# Altium PCB IOT_Speaker.PcbDoc (part 1 of 4)
Units mm, origin at the board's own origin, x right, y up, seen from the top; angles counter-clockwise.
Board outline 89.7 x 68.14 mm, 2 copper layers (Top Layer, Bottom Layer), stack 1.448 mm thick; 210 components, 131 nets, 623 pads, 336 vias.
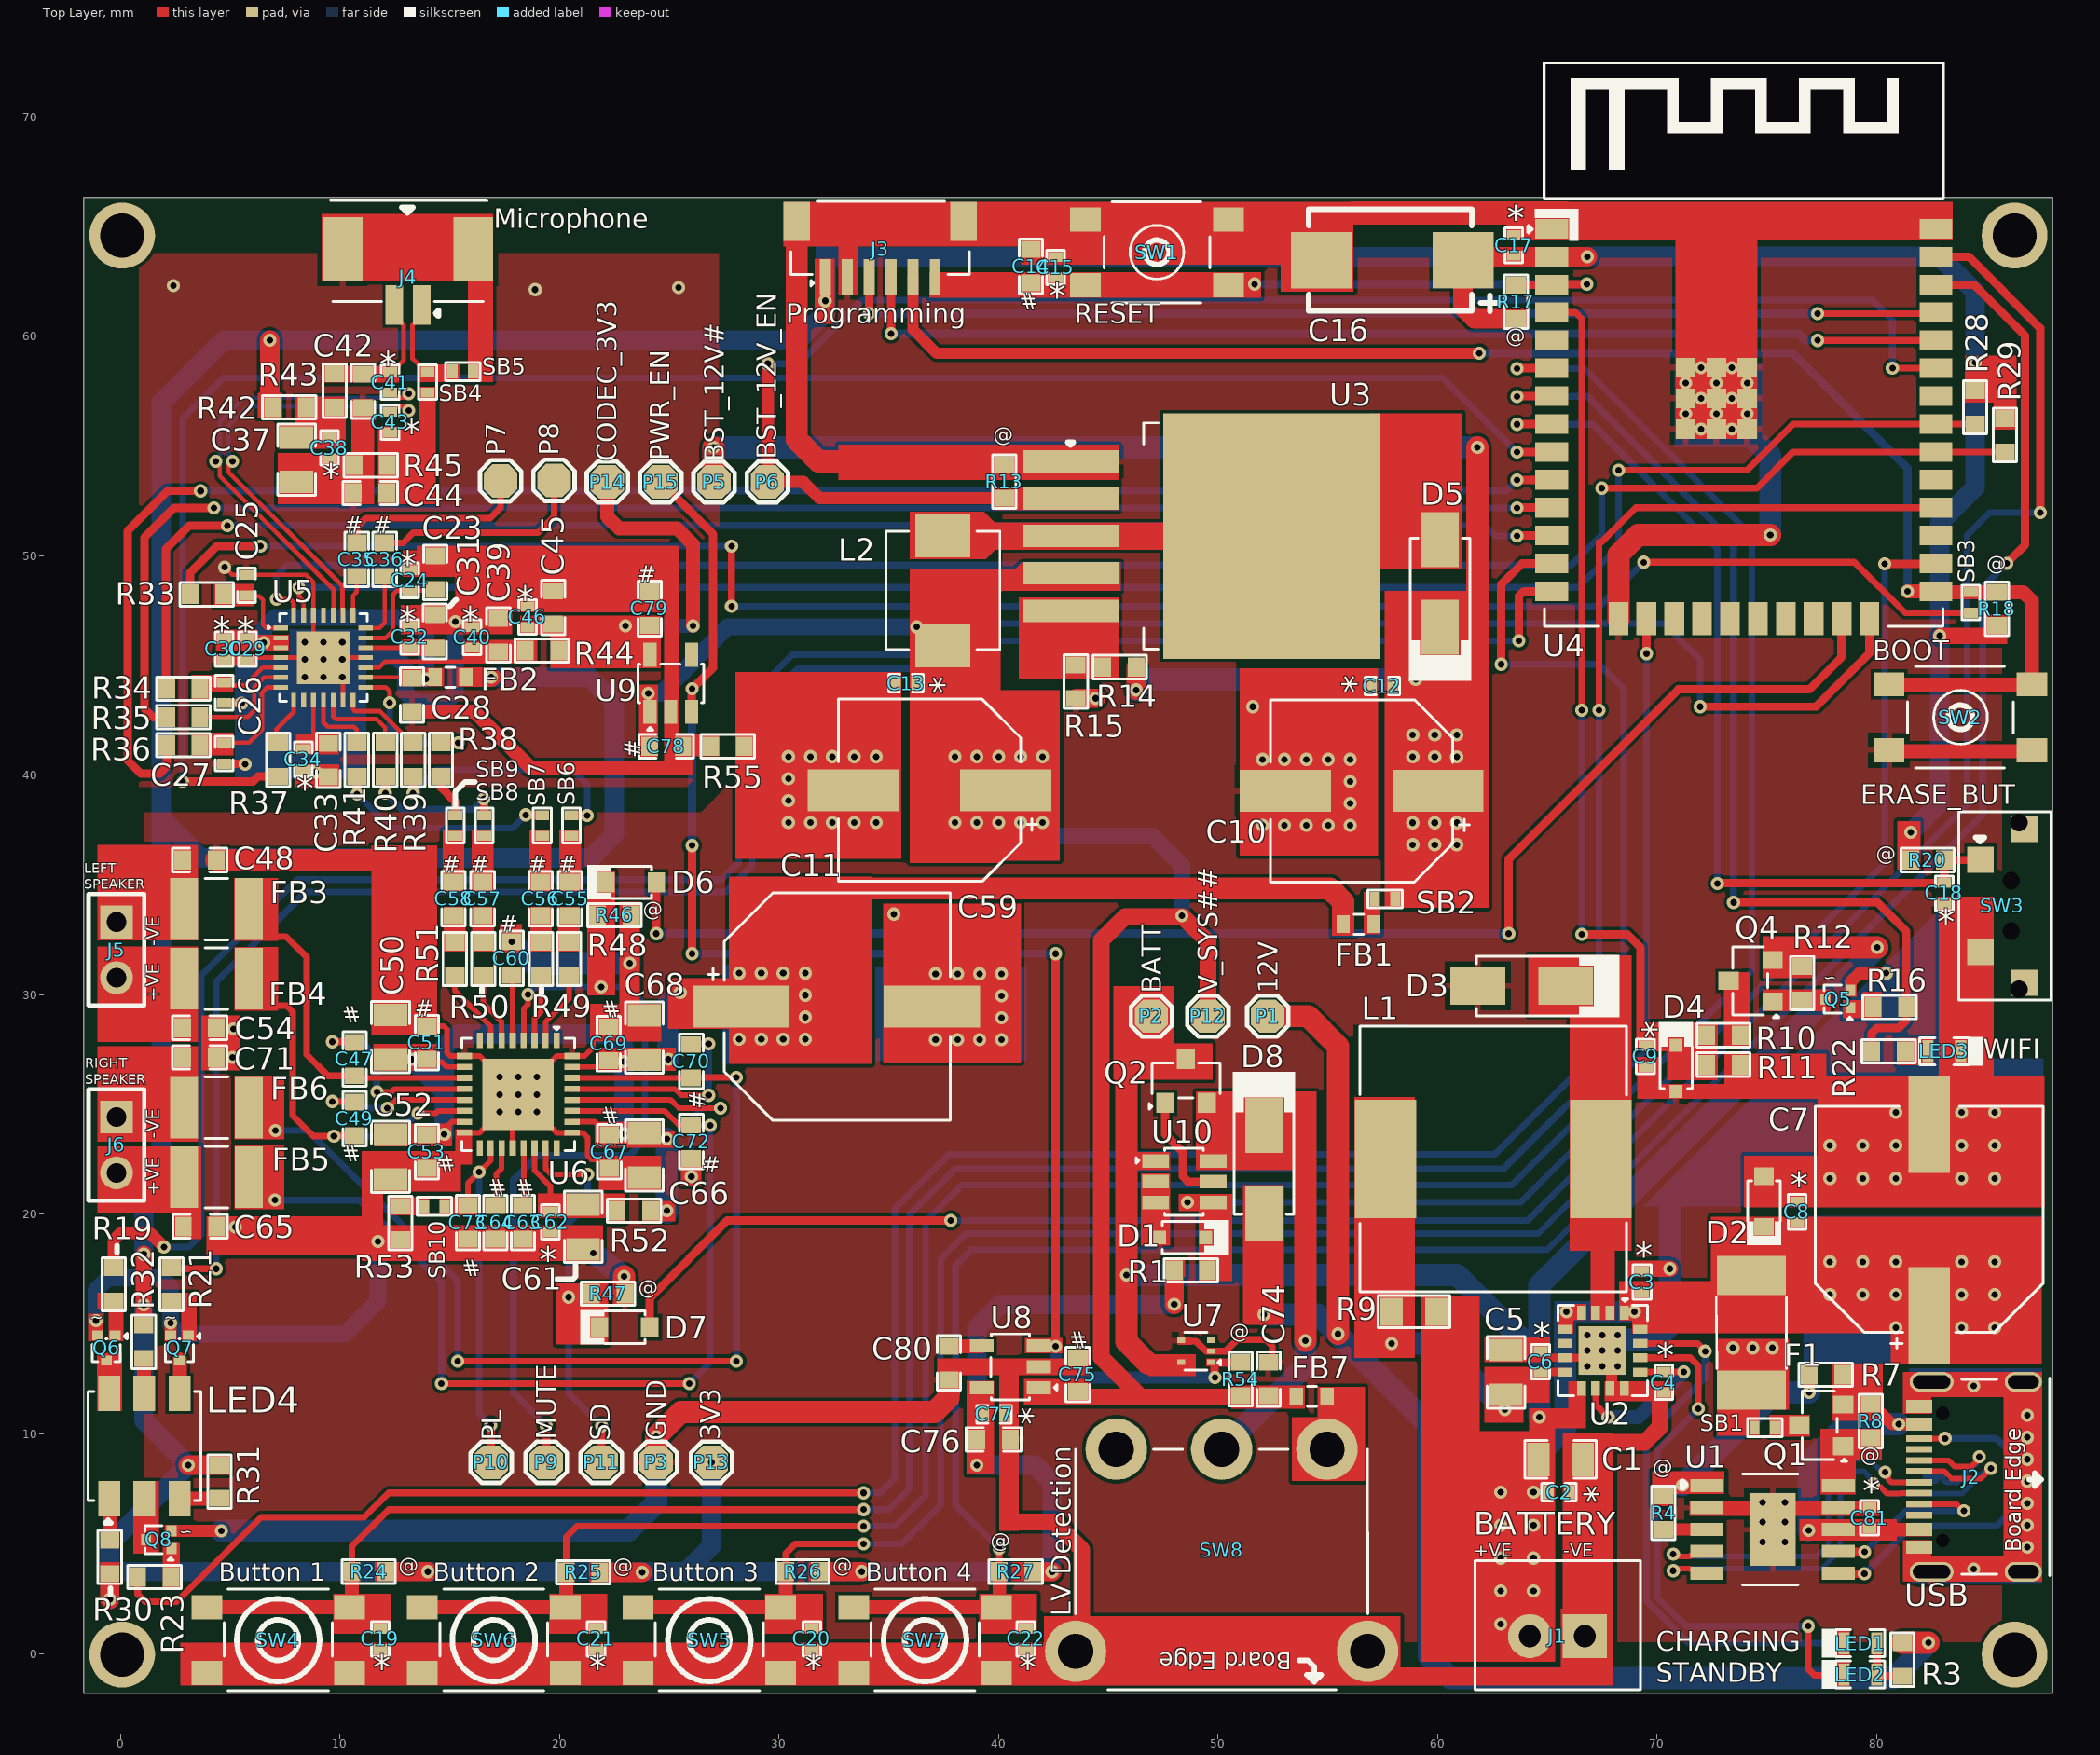
[diagram p0: Top Layer view]
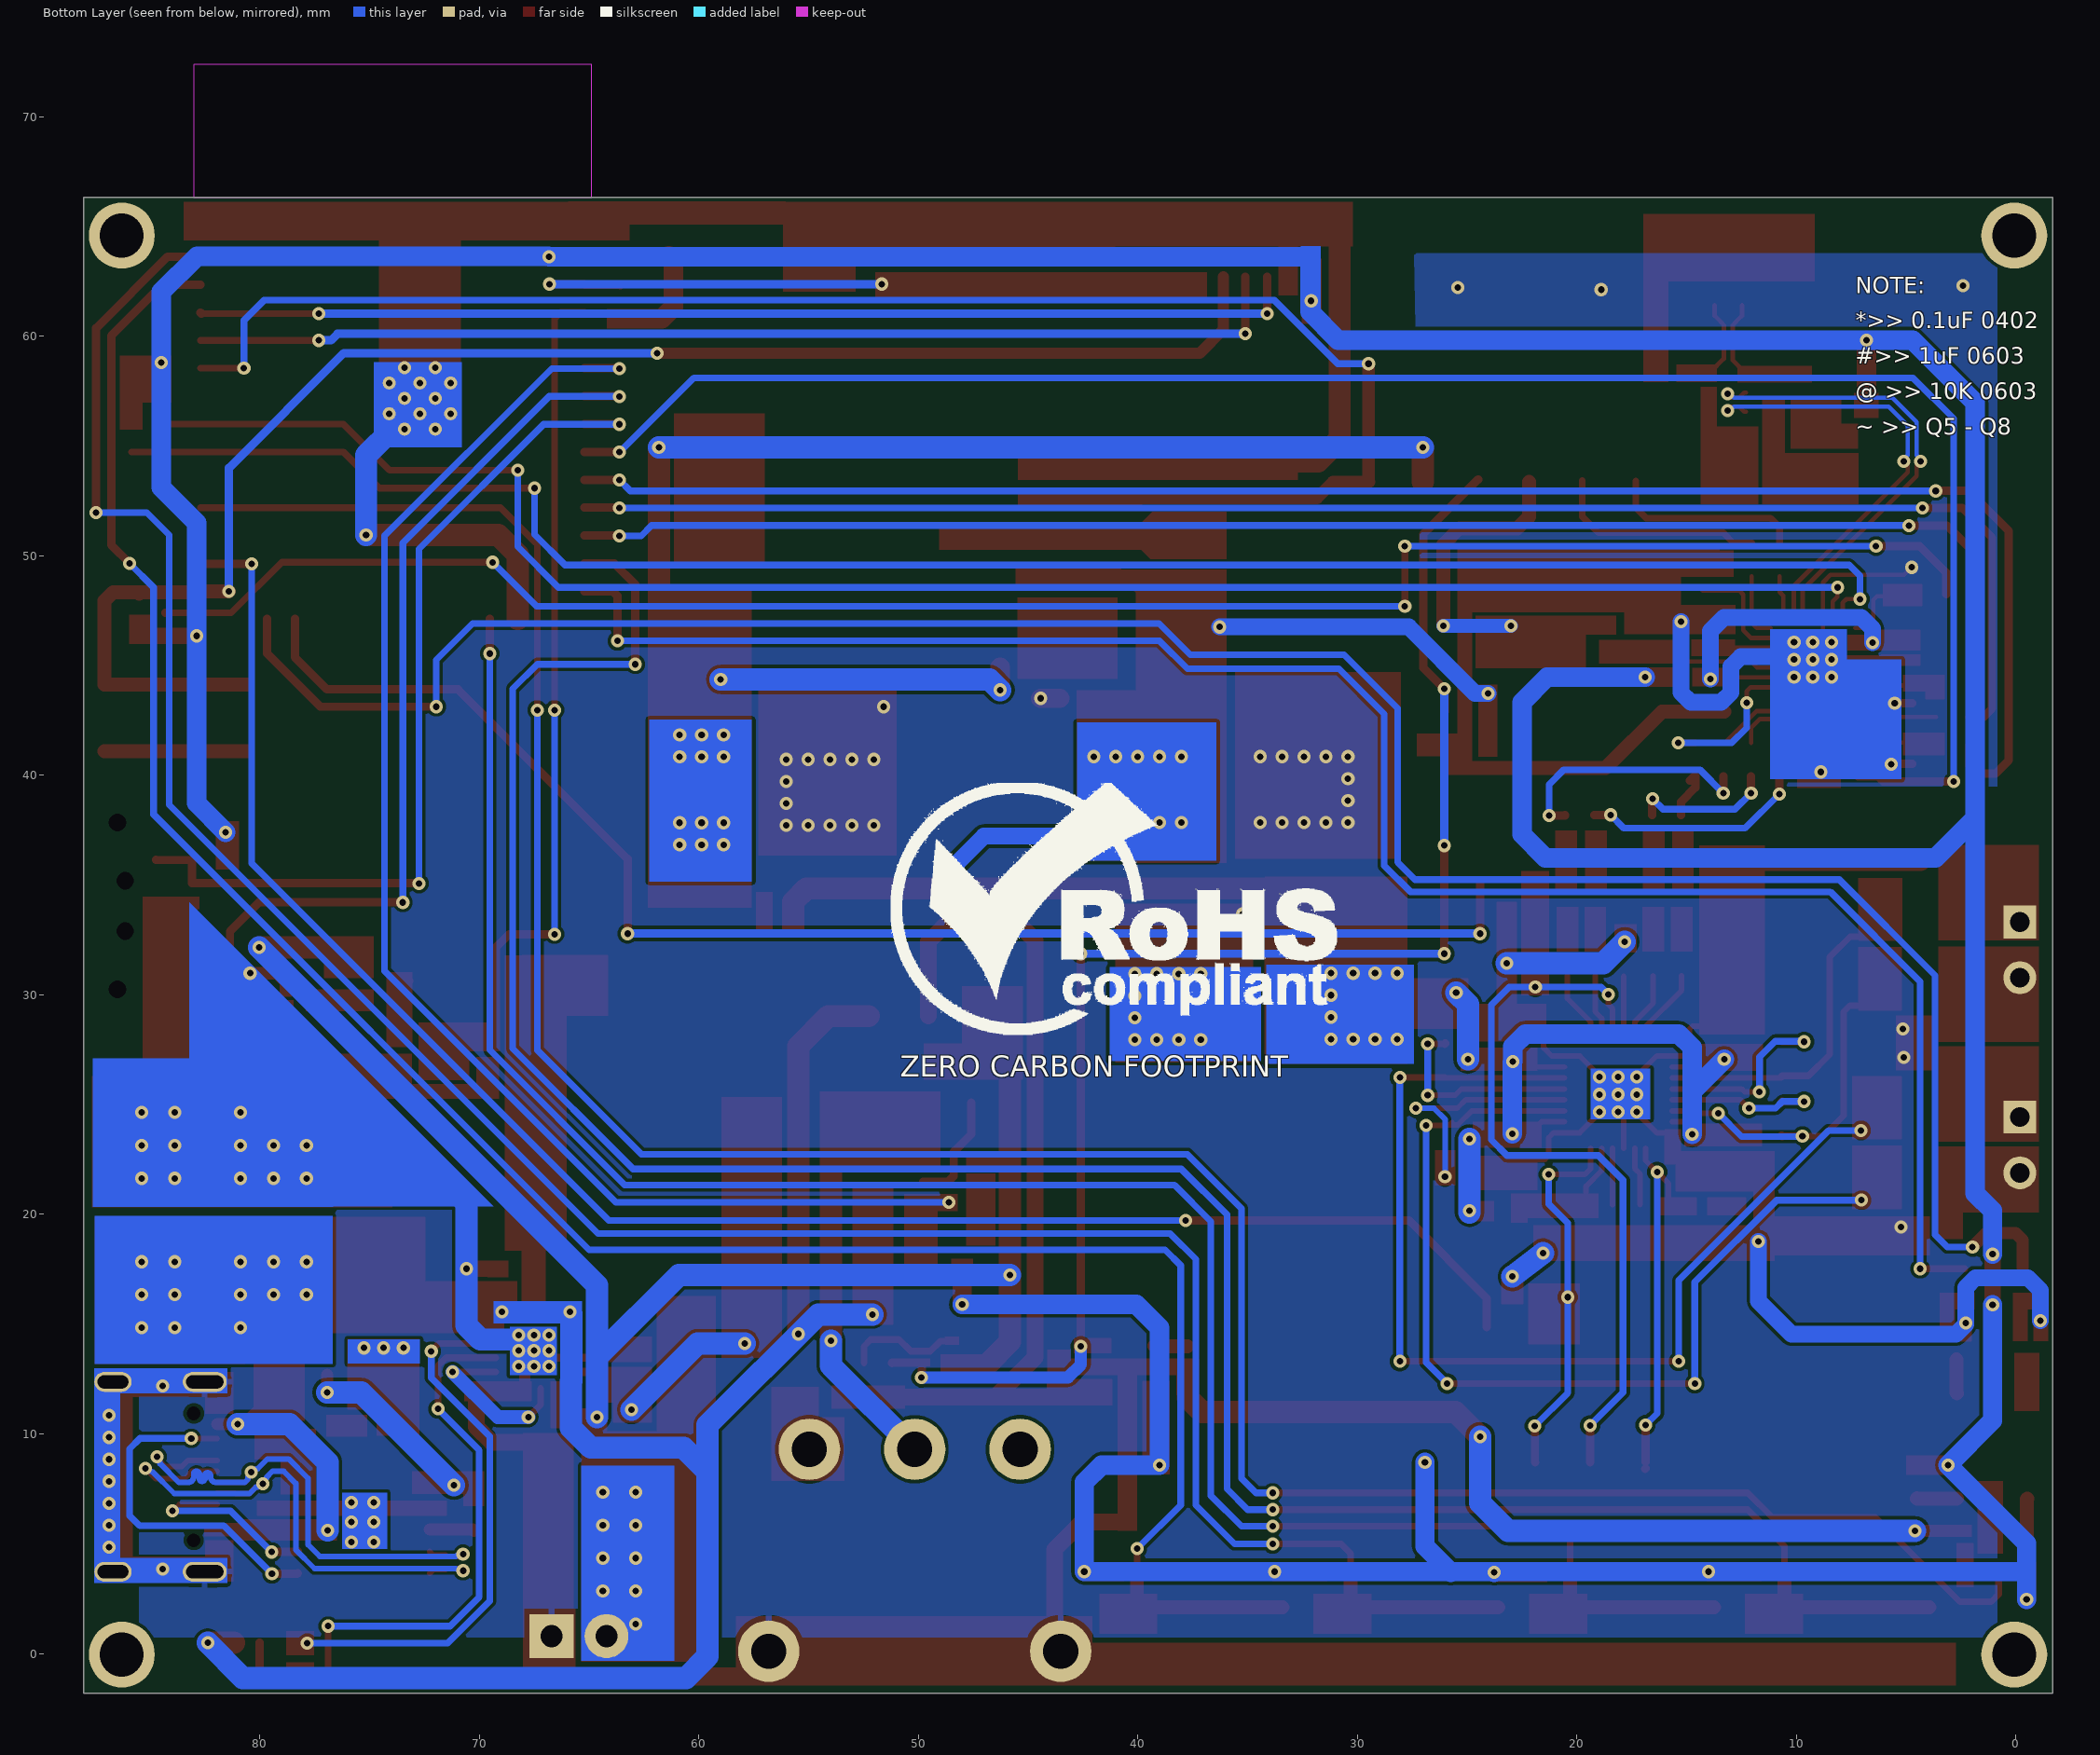
[diagram p1: Bottom Layer view, seen from below]
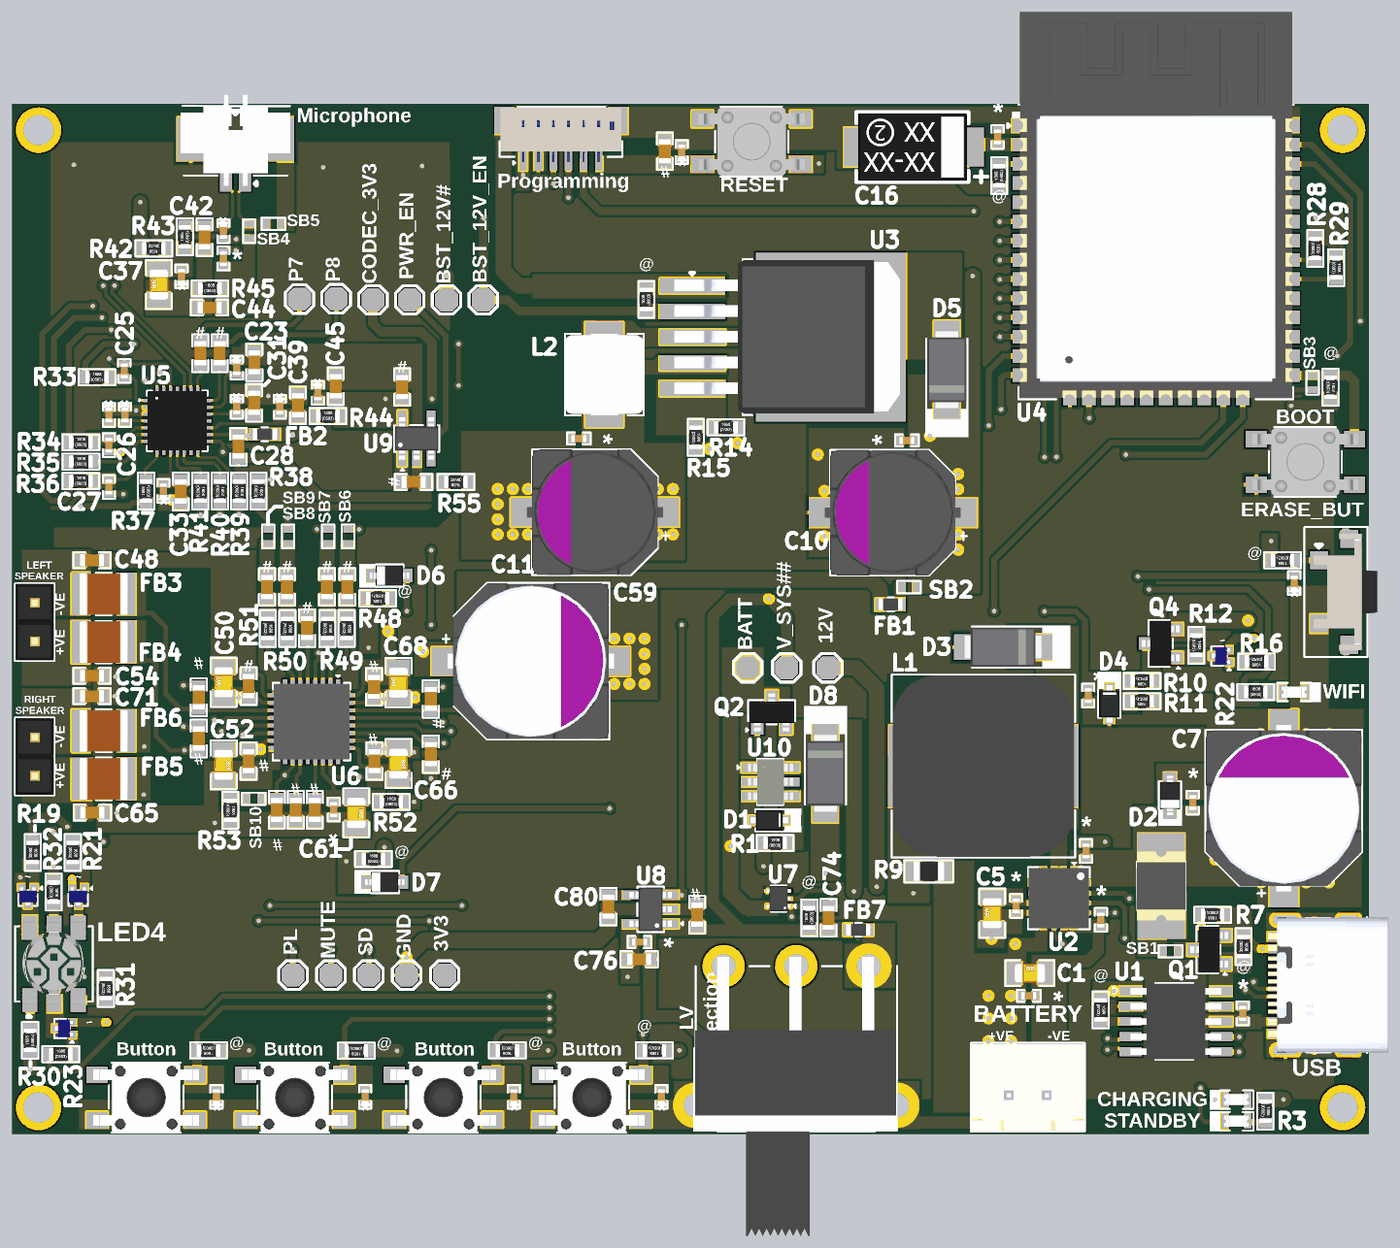
[diagram p4: 3D render of the assembled board from above, using the file's embedded part models]

## Layer stack, top to bottom
Top Solder: solder mask 0.0762, Solder Resist, Dk 3.5
Top Layer: signal copper 0.254
Dielectric 1: dielectric 0.9398, FR-4, Dk 4.8
Bottom Layer: signal copper 0.254
Bottom Solder: solder mask 0.0762, Solder Resist, Dk 3.5

## Board outline
-1.676,-1.803 -1.676,66.335 88.026,66.335 88.026,-1.803

## Design rules (kind name [scope] priority, off if disabled: settings)
Clearance [All] p1: gap=0.152 ignorepadtopadclearanceinfootprint=FALSE except(0.102: Arc-SMDPad Track-SMDPad SMDPad-SMDPad)
DiffPairsRouting DiffPairsRouting_2 [InDifferentialPairClass('USB_Lines')] p1: maxlimit=0.305 minlimit=0.305 mostfreqgap=0.305 toplayer_minwidth=0.254 toplayer_maxwidth=0.254 toplayer_prefwidth=0.254 bottomlayer_minwidth=0.254 bottomlayer_maxwidth=0.254 bottomlayer_prefwidth=0.254 maxuncoupledlength=12.7
DiffPairsRouting DiffPairsRouting_1 [InDifferentialPairClass('MIC1_IN_Lines')] p2: maxlimit=0.203 minlimit=0.203 mostfreqgap=0.203 toplayer_minwidth=0.203 toplayer_maxwidth=0.203 toplayer_prefwidth=0.203 bottomlayer_minwidth=0.203 bottomlayer_maxwidth=0.203 bottomlayer_prefwidth=0.203 maxuncoupledlength=12.7
DiffPairsRouting [InDifferentialPairClass('MIC1_Lines')] p3: maxlimit=0.203 minlimit=0.203 mostfreqgap=0.203 toplayer_minwidth=0.203 toplayer_maxwidth=0.203 toplayer_prefwidth=0.203 bottomlayer_minwidth=0.203 bottomlayer_maxwidth=0.203 bottomlayer_prefwidth=0.203 maxuncoupledlength=12.7
HoleSize [All] p1: absolutevalues=TRUE maxlimit=25.4 minlimit=0.025 maxpercent=80.000 minpercent=20.000
HoleToHoleClearance [All] p1: gap=0 allowstackedmicrovias=TRUE
MatchedLengths "Schematic Matched Net Lengths_1" [InNetClass('USB')] p1: tolerance=1.27 checknetsindiffpair=FALSE checkdiffpairvsdiffpair=TRUE checkxsignals=TRUE checkothers=TRUE
MaxMinImpedance "Schematic Impedance Constraint_1" [InNetClass('USB')] p1: minimum=85.00 maximum=90.00
MinimumSolderMaskSliver [All] p1: minsoldermaskwidth=0
PolygonConnect [All] p1: thpad.connectstyle=Relief thpad.reliefconductorwidth=0.254 thpad.reliefentries=4 thpad.polygonreliefangle="90 Angle" thpad.airgapwidth=0.254 smdpad.connectstyle=Relief smdpad.reliefconductorwidth=0.254 smdpad.reliefentries=4 smdpad.polygonreliefangle="90 Angle" smdpad.airgapwidth=0.254 via.connectstyle=Direct via.reliefconductorwidth=0.254 via.reliefentries=4 via.polygonreliefangle="90 Angle" via.airgapwidth=0.254
RoutingVias [All] p1: holewidth=0.3 width=0.6 viastyle="Through Hole" minholewidth=0.3 minwidth=0.6 maxholewidth=0.3 maxwidth=0.6
SilkToSilkClearance [All] p1: silktosilkclearance=0
SilkToSolderMaskClearance [IsPad] p1: minsilkscreentomaskgap=0 clearancetoexposedcopper=TRUE
SolderMaskExpansion [All] p1: expansion=0.102 istentingtop=FALSE
Width [All] p1: maxlimit=1.016 minlimit=0.203 preferedwidth=0.559
24 further rules are at their usual default settings.

## Classes and differential pairs
component class U_Power-Sheet-2: C74 C75 C76 C77 C78 C79 C80 FB7 P12 P13 P14 P15 R54 R55 SW8 U7 U8 U9
differential pair class USB_Lines: D
net class USB: D_N D_P
differential pair class MIC1_Lines: MIC MIC_IN
differential pair class MIC1_IN_Lines: MIC_IN
net class MIC1: MIC_IN_N MIC_IN_P MIC_N MIC_P
net class MIC1_IN: MIC_IN_N MIC_IN_P
component class U_Power-Sheet-3: C9 C10 C11 C12 C13 D4 D5 FB1 L2 P5 P6 Q4 Q5 R10 R11 R12 R13 R14 R15 R16 SB2 SS U3
component class U_Power-Sheet-1: C1 C2 C3 C4 C5 C6 C7 C8 C81 D1 D2 D3 D8 F1 J1 J2 L1 LED1 LED2 P1 P2 P3 Q1 Q2 R1 R3 R4 R7 R8 R9 SB1 U1 U2 U10
component class U_Controller-Sheet: C14 C15 C16 C17 C18 C19 C20 C21 C22 J3 LED3 LED4 Q6 Q7 Q8 R17 R18 R19 R20 R21 R22 R23 R24 R25 R26 R27 R28 R29 R30 R31 R32 SB3 SW1 SW2 SW3 SW4 SW5 SW6 SW7 U4
component class U_Audio-Sheet: C23 C24 C25 C26 C27 C28 C29 C30 C31 C32 C33 C34 C35 C36 C37 C38 C39 C40 C41 C42 C43 C44 C45 C46 FB2 J4 P7 P8 R33 R34 R35 R36 R37 R38 R39 R40 R41 R42 R43 R44 R45 SB4 SB5 ss U5
component class U_Audio-Amplifier: C47 C48 C49 C50 C51 C52 C53 C54 C55 C56 C57 C58 C59 C60 C61 C62 C63 C64 C65 C66 C67 C68 C69 C70 C71 C72 C73 D6 D7 FB3 FB4 FB5 FB6 J5 J6 P9 P10 P11 R46 R47 R48 R49 R50 R51 R52 R53 SB6 SB7 SB8 SB9 SB10 U6
differential pair D: +D_P -D_N
differential pair MIC: +MIC_P -MIC_N
differential pair MIC_IN: +MIC_IN_P -MIC_IN_N

## Components (designator, comment, footprint, x,y, rotation, side; value= is the part's Value field where it differs from the comment)
C1 "10uF" Cap-0805 65.608,8.839 r0 top
C2 "100nF" Cap-0402 65.532,7.341 r0 top
C3 "100nF" Cap-0402 69.317,16.916 r90 top
C4 "100nF" Cap-0402 70.304,12.355 r90 top
C5 "10uF" Cap-0805 63.119,12.802 r90 top
C6 "100nF" Cap-0402 64.694,13.284 r90 top
C7 "330uF" 25SVPF330M 82.398,19.742 r90 top locked
C8 "100nF" Cap-0402 76.378,20.117 r90 top
C9 "100nF" Cap-0402 69.469,27.203 r90 top
C10 "100uF" 25SVPF100M. 56.545,39.294 r180 top locked
C11 "100uF" 25SVPF100M. 36.855,39.319 r180 top locked
C12 "100nF" Cap-0402 57.48,44.069 r180 top
C13 "100nF" Cap-0402 35.789,44.196 r180 top
C14 "1uF" Cap-0603 41.478,63.195 r270 top
C15 "100nF" Cap-0402 42.596,63.144 r270 top
C16 "100uF" Case-E 61.163,63.475 r180 top
C17 "100nF" Cap-0402 63.475,64.148 r90 top
C18 "100nF" Cap-0402 83.083,34.633 r270 top
C19 "100nF" Cap-0402 11.836,0.66 r270 top locked
C20 "100nF" Cap-0402 31.496,0.66 r270 top locked
C21 "100nF" Cap-0402 21.666,0.66 r270 top locked
C22 "100nF" Cap-0402 41.25,0.66 r270 top locked
C23 "4.7uF" Cap-0603 14.338,49.238 r90 top
C24 "100nF" Cap-0402 13.183,48.882 r90 top
C25 "33pF" Cap-0402 5.74,48.666 r90 top
C26 "33pF" Cap-0402 4.724,43.764 r270 top
C27 "33pF" Cap-0402 4.724,40.996 r270 top
C28 "4.7uF" Cap-0603 13.284,43.663 r90 top
C29 "100nF" Cap-0402 5.791,45.758 r90 top
C30 "100nF" Cap-0402 4.724,45.758 r90 top
C31 "4.7uF" Cap-0603 14.326,46.558 r90 top
C32 "100nF" Cap-0402 13.183,46.304 r90 top
C33 "4.7uF" Cap-0603 9.474,40.691 r90 top
C34 "100nF" Cap-0402 8.331,40.729 r90 top
C35 "1uF" Cap-0603 10.77,49.835 r90 top
C36 "1uF" Cap-0603 12.04,49.835 r90 top
C37 "10uF" Cap-0805 8.026,54.381 r90 top
C38 "100nF" Cap-0402 9.525,54.915 r90 top
C39 "4.7uF" Cap-0603 17.221,46.393 r90 top
C40 "100nF" Cap-0402 16.027,46.291 r90 top
C41 "100nF" Cap-0402 12.294,57.912 r90 top
C42 "10nF" Cap-0603 11.049,57.506 r90 top
C43 "100nF" Cap-0402 12.294,56.096 r270 top
C44 "10nF" Cap-0603 11.379,52.857 r0 top
C45 "4.7uF" Cap-0603 19.721,47.65 r90 top
C46 "100nF" Cap-0402 18.542,47.219 r90 top
C47 "1uF" Cap-0603 10.668,27.076 r90 top
C48 "200pF" Cap-0603 3.607,36.144 r180 top
C49 "1uF" Cap-0603 10.668,24.359 r90 top
C50 "10uF" Cap-0805 12.308,28.077 r90 top
C51 "1uF" Cap-0603 13.959,27.823 r90 top
C52 "10uF" Cap-0805 12.308,22.616 r270 top
C53 "1uF" Cap-0603 13.959,22.86 r270 top
C54 "200pF" Cap-0603 3.607,28.502 r180 top
C55 "1uF" Cap-0603 20.487,34.376 r270 top
C56 "1uF" Cap-0603 19.141,34.376 r270 top
C57 "1uF" Cap-0603 16.499,34.376 r270 top
C58 "1uF" Cap-0603 15.178,34.376 r270 top
C59 "330uF" 25SVPF330M 32.62,29.464 r0 top locked
C60 "1uF" Cap-0603 17.82,31.658 r90 top
C61 "10uF" Cap-0805 21.082,19.431 r270 top
C62 "100nF" Cap-0402 19.583,19.66 r270 top
C63 "1uF" Cap-0603 18.33,19.634 r270 top
C64 "1uF" Cap-0603 17.077,19.634 r270 top
C65 "200pF" Cap-0603 3.632,19.456 r180 top
C66 "10uF" Cap-0805 23.865,22.692 r270 top
C67 "1uF" Cap-0603 22.276,22.86 r270 top
C68 "10uF" Cap-0805 23.865,28.052 r90 top
C69 "1uF" Cap-0603 22.25,27.772 r90 top
C70 "1uF" Cap-0603 26.01,26.975 r90 top
C71 "200pF" Cap-0603 3.607,27.153 r180 top
C72 "1uF" Cap-0603 26.01,23.317 r270 top
C73 "1uF" Cap-0603 15.824,19.634 r270 top
C74 "100pF" Cap-0603 52.299,12.497 r90 top
C75 "1uF" Cap-0603 43.612,12.7 r90 top
C76 "22uF" Cap-0603 39.776,9.754 r0 top
C77 "100nF" Cap-0402 39.802,10.897 r0 top
C78 "1uF" Cap-0603 24.867,41.326 r0 top
C79 "1uF" Cap-0603 24.105,47.6 r90 top
C80 "0.01uF" Cap-0603 37.744,13.233 r90 top
C81 "100nF" Cap-0402 79.68,6.172 r90 top
D1 "MM3Z3V3B" SOD323F 48.387,18.948 r0 top
D2 "PESD12VS1UA,115" SOD-323 74.874,20.589 r90 top
D3 "SS34" SMA 63.837,30.404 r180 top
D4 "MM3Z3V3B" SOD323F 70.866,26.648 r90 top
D5 "SS34" SMA 60.122,48.743 r90 top
D6 "1N4148WS-7-F" SOD-323 23.266,35.128 r0 top
D7 "1N4148WS-7-F" SOD-323 22.962,14.859 r0 top
D8 "SS34" SMA 52.095,22.054 r270 top
F1 "BSMD1812-260-13.2V" 1812-FUSE 74.295,14.605 r90 top
FB1 "BLM18SG121TN1D" "IND-0603 (1608 Metric)" 56.399,33.223 r0 top
FB2 "BLM18SG121TN1D" "IND-0603 (1608 Metric)" 15.037,44.475 r180 top
FB3 "FBMH3225HM601NT" IND-1210 4.382,33.912 r180 top locked
FB4 "FBMH3225HM601NT" IND-1210 4.382,30.737 r180 top locked
FB5 "FBMH3225HM601NT" IND-1210 4.382,21.692 r180 top locked
FB6 "FBMH3225HM601NT" IND-1210 4.382,24.867 r180 top locked
FB7 "BLM18SG121TN1D" "IND-0603 (1608 Metric)" 54.266,11.709 r0 top
J1 "B2B-XH-A(LF)(SN)" B2B-XH-A(LF)(SN)_ 65.456,0.787 r180 top locked
J2 "TYPE-C-31-M-12" TYPE-C-31-M-12_ 81.937,4.846 r90 top locked
J3 "Voltlink Target" "Voltlink Target" 34.609,63.975 r0 top locked
J4 "DNP" 1.25-2PWB 13.103,62.708 r180 top locked
J5 "61300211121" HDR1X2_ -0.178,33.325 r270 top locked
J6 "61300211121" HDR1X2_ -0.178,24.435 r270 top locked
L1 "22UH" YPRH1204-220M_ 62.537,22.53 r180 top locked
L2 "47uH" YSPI0520-2R2M_ 37.465,48.427 r90 top
LED1 "Emerald" LED-0603 79.258,0.467 r180 top
LED2 "RED" LED-0603 79.258,-0.956 r180 top
LED3 "White" LED-0603 83.083,27.432 r0 top
LED4 "MHP5050RGBDT" SMD5050 1.092,9.449 r90 top locked
P1 "TEST POINT" Test-point 52.267,29.032 r0 top
P2 "TEST POINT" Test-point 46.965,29.032 r180 top
P3 "TEST POINT" Test-point 24.409,8.712 r0 top
P5 "TEST POINT" Test-point 27.043,53.365 r0 top
P6 "TEST POINT" Test-point 29.472,53.365 r180 top
P7 "TEST POINT" Test-point 17.323,53.416 r180 top
P8 "TEST POINT" Test-point 19.753,53.442 r0 top
P9 "TEST POINT" Test-point 19.399,8.712 r0 top
P10 "TEST POINT" Test-point 16.891,8.712 r0 top
P11 "TEST POINT" Test-point 21.907,8.712 r270 top
P12 "TEST POINT" Test-point 49.536,29.032 r270 top
P13 "TEST POINT" Test-point 26.924,8.712 r0 top
P14 "TEST POINT" Test-point 22.183,53.365 r0 top
P15 "TEST POINT" Test-point 24.613,53.365 r0 top
Q1 "G7P03L" SOT-23-3L_ 77.478,10.389 r90 top locked
Q2 "AO3407" SOT-23 48.539,26.086 r0 top locked
Q4 "AO3407" SOT-23 74.26,30.643 r90 top
Q5 "MMBT3904M" SOT-723 78.241,29.813 r90 top locked
Q6 "MMBT3904M" SOT-723 -0.635,13.919 r180 top
Q7 "MMBT3904M" SOT-723 2.692,13.919 r180 top
Q8 "MMBT3904M" SOT-723 1.753,5.182 r90 top
R1 "470K" Res-0603 48.768,17.45 r180 top
R3 "1K" Res-0603 81.178,-0.279 r90 top
R4 "10K" Res-0603 70.288,6.407 r90 top
R7 "1K" Res-0603 77.691,12.69 r0 top
R8 "10K" Res-0603 79.731,10.592 r90 top
R9 "82mΩ" RES-0805 58.928,15.57 r0 top
R10 "47K" Res-0603 73.025,28.163 r0 top
R11 "15K" Res-0603 73.025,26.822 r0 top value=15kR
R12 "1K" Res-0603 76.606,30.531 r90 top
R13 "10K" Res-0603 40.259,53.391 r270 top
R14 "24K" Res-0603 45.517,44.933 r180 top value=24kR
R15 "2.74K" Res-0603 43.523,44.272 r90 top value=2.74kR
R16 "4.7K" Res-0603 80.594,29.439 r0 top
R17 "10K" Res-0603 63.576,61.57 r270 top
R18 "10K" Res-0603 85.484,47.587 r90 top
R19 "4.7K" Res-0603 -0.305,16.815 r90 top
R20 "10K" Res-0603 82.321,36.144 r0 top
R21 "4.7K" Res-0603 2.337,16.815 r90 top
R22 "51R" Res-0603 80.543,27.432 r180 top
R23 "4.7K" Res-0603 1.549,3.48 r180 top
R24 "10K" Res-0603 11.31,3.727 r0 top
R25 "10K" Res-0603 21.078,3.702 r0 top
R26 "10K" Res-0603 31.075,3.727 r0 top
R27 "10K" Res-0603 40.792,3.727 r0 top
R28 "4.7K" Res-0603 84.48,56.769 r90 top
R29 "4.7K" Res-0603 85.852,55.499 r90 top
R30 "33R" Res-0603 -0.483,4.394 r270 top
R31 "33R" Res-0603 4.521,7.823 r90 top
R32 "91R" Res-0603 1.067,14.199 r90 top
R33 "22R" Res-0603 3.937,48.247 r180 top
R34 "22R" Res-0603 2.87,43.942 r180 top
R35 "22R" Res-0603 2.87,42.659 r180 top
R36 "22R" Res-0603 2.87,41.377 r180 top
R37 "22R" Res-0603 7.188,40.716 r270 top
R38 "0R" Res-0603 14.605,40.716 r90 top
R39 "0R" Res-0603 13.335,40.716 r90 top
R40 "0R" Res-0603 12.065,40.716 r90 top
R41 "0R" Res-0603 10.77,40.716 r90 top
R42 "1K" Res-0603 7.696,56.769 r0 top
R43 "2.2K" Res-0603 9.754,57.531 r270 top
R44 "10R" Res-0603 19.202,45.682 r180 top
R45 "2.2K" Res-0603 11.405,54.127 r180 top
R46 "10K" Res-0603 22.504,33.63 r0 top
R47 "10K" Res-0603 22.214,16.393 r180 top
R48 "5.1K" Res-0603 20.436,31.633 r90 top
R49 "5.1K" Res-0603 19.166,31.633 r90 top
R50 "5.1K" Res-0603 16.524,31.633 r90 top
R51 "5.1K" Res-0603 15.229,31.633 r90 top
R52 "10R" Res-0603 23.393,20.168 r180 top
R53 "73.2K" Res-0603 12.751,19.609 r90 top value=73.2kR
R54 "10K" Res-0603 51.029,12.497 r270 top
R55 "0R" Res-0603 27.661,41.326 r0 top
SB1 "Solder Bridge 0402" "Solder Bridge 0402" 74.905,10.287 r180 top
SB2 "Solder Bridge 0402" "Solder Bridge 0402" 57.607,34.366 r180 top
SB3 "Solder Bridge 0402" "Solder Bridge 0402" 84.303,47.879 r270 top
SB4 "Solder Bridge 0402" "Solder Bridge 0402" 13.995,57.912 r90 top
SB5 "Solder Bridge 0402" "Solder Bridge 0402" 15.596,58.395 r180 top
SB6 "Solder Bridge 0402" "Solder Bridge 0402" 20.538,37.716 r270 top
SB7 "Solder Bridge 0402" "Solder Bridge 0402" 19.217,37.716 r270 top
SB8 "Solder Bridge 0402" "Solder Bridge 0402" 16.575,37.716 r270 top
SB9 "Solder Bridge 0402" "Solder Bridge 0402" 15.254,37.716 r270 top
SB10 "Solder Bridge 0402" "Solder Bridge 0402" 14.3,20.371 r180 top
SW1 "TS-1109S-C-B" TS-1109S-C-B 47.219,63.83 r180 top locked
SW2 "TS-1109S-C-B" TS-1109S-C-B 83.82,42.647 r180 top locked
SW3 "ST-1112RA-P" ST-1112RA-P_ 85.731,34.054 r270 top locked
SW4 "TS-1109S-B-J" TS-1109S-B-J_ 7.188,0.61 r0 top locked
SW5 "TS-1109S-B-J" TS-1109S-B-J_ 26.831,0.61 r0 top locked
SW6 "TS-1109S-B-J" TS-1109S-B-J_ 17.01,0.61 r0 top locked
SW7 "TS-1109S-B-J" TS-1109S-B-J_ 36.652,0.61 r0 top locked
SW8 "SS-12D11L5" SS-12D11L5 50.165,4.699 r180 top locked
U1 "CH224K" ESSOP-10 75.263,5.645 r0 top locked
U2 "TP5100" TQFN-16-EP(4x4)_ 67.514,13.796 r270 top locked
U3 "XL6019E1" "TO-263-5 (D2PAK)" 47.879,50.902 r270 top locked
U4 "ESP32-WROOM-32E-N8" "38-SMD Module" 73.952,56.017 r0 top locked
U5 "ES8388" QFN-28-EP(4x4) 9.246,45.364 r0 top locked
U6 "PAM8006ATR" 32-QFN 18.119,25.469 r270 top locked
U7 "BD4860FVE-TR" VSOF-5 48.997,13.767 r180 top
U8 "SPX3819M5-L-3-3/TR" SOT-23-5 40.538,13.056 r180 top locked
U9 "TPS70933DBVR" SOT-23-5 25.07,44.196 r90 top locked
U10 "LTC4412IS6#TRPBF" SOT-23-6 48.463,21.488 r0 top locked

## Footprints (in the part's own frame and the unit in brackets; to place one, negate y for a bottom-side part, rotate by r counter-clockwise, add the part's x,y. Pads: shape width x height; smd on the part's side, far side on the other; paste and mask are expansions set on the pad)
1.25-2PWB [mm]
  rect 0.8x1.8 smd: 1(-0.625,1.275) 2(0.625,1.275)
  rect 1.8x2.9 smd: MP1(-2.975,-1.275) MP2(2.975,-1.275)
  silkscreen extent -3.6,-3.48 3.52,1.78, body extent -3.62,-4.24 3.62,1.81, height 3.5
25SVPF100M. [mm]
  rect 4.15x1.9 smd: 1(-3.475,0) 2(3.475,0)
  silkscreen extent -4.9,-4.15 4.15,4.15, body extent -4.5,-4.15 4.5,4.15, height 6.9
25SVPF330M [mm]
  rect 4.4x1.9 smd: 1(-4.35,0) 2(4.35,0)
  silkscreen extent -5.84,-5.18 5.18,5.18, body extent -5.5,-5.15 5.5,5.15, height 12.6
32-QFN [mm] "32pins, 5x5mm body, 0.5mm pitch QFN package"
  rect 0.7x0.28 smd: 1(-2.45,1.75) 2(-2.45,1.25) 3(-2.45,0.75) 4(-2.45,0.25) 5(-2.45,-0.25) 6(-2.45,-0.75) 7(-2.45,-1.25) 8(-2.45,-1.75) 17(2.45,-1.75) 18(2.45,-1.25) 19(2.45,-0.75) 20(2.45,-0.25) 21(2.45,0.25) 22(2.45,0.75) 23(2.45,1.25) 24(2.45,1.75)
  rect 0.28x0.7 smd: 9(-1.75,-2.45) 10(-1.25,-2.45) 11(-0.75,-2.45) 12(-0.25,-2.45) 13(0.25,-2.45) 14(0.75,-2.45) 15(1.25,-2.45) 16(1.75,-2.45) 25(1.75,2.45) 26(1.25,2.45) 27(0.75,2.45) 28(0.25,2.45) 29(-0.25,2.45) 30(-0.75,2.45) 31(-1.25,2.45) 32(-1.75,2.45)
  rect 3.254x3.254 smd: 33(0,0)
  silkscreen extent -3.07,-2.57 2.57,2.57, body extent -2.5,-2.5 2.5,2.5, height 0.85
"38-SMD Module" [mm]
  rect 1.5x0.9 smd: 1(-8.75,8.88) 2(-8.75,7.61) 3(-8.75,6.34) 4(-8.75,5.07) 5(-8.75,3.8) 6(-8.75,2.53) 7(-8.75,1.26) 8(-8.75,-0.01) 9(-8.75,-1.28) 10(-8.75,-2.55) 11(-8.75,-3.82) 12(-8.75,-5.09) 13(-8.75,-6.36) 14(-8.75,-7.63) 25(8.75,-7.63) 26(8.75,-6.36) 27(8.75,-5.09) 28(8.75,-3.82) 29(8.75,-2.55) 30(8.75,-1.28) 31(8.75,-0.01) 32(8.75,1.26) 33(8.75,2.53) 34(8.75,3.8) 35(8.75,5.07) 36(8.75,6.34) 37(8.75,7.61) 38(8.75,8.88)
  rect 0.9x1.5 smd: 15(-5.71,-8.88) 16(-4.44,-8.88) 17(-3.17,-8.88) 18(-1.9,-8.88) 19(-0.63,-8.88) 20(0.64,-8.88) 21(1.91,-8.88) 22(3.18,-8.88) 23(4.45,-8.88) 24(5.72,-8.88)
  rect 0.9x0.9 smd: 39(-2.65,2.56) 40(-1.25,2.56) 41(0.15,2.56) 42(-2.65,1.16) 43(-1.25,1.16) 44(0.15,1.16) 45(-2.65,-0.24) 46(-1.25,-0.24) 47(0.15,-0.24)
  round 0.6 hole 0.3 mask+0: 39_10(-1.95,2.56) 39_11(-0.55,2.56) 39_12(-2.65,1.86) 39_13(-1.25,1.86) 39_14(0.15,1.86) 39_15(-1.95,1.16) 39_16(-0.55,1.16) 39_17(-2.65,0.46) 39_18(-1.25,0.46) 39_19(0.15,0.46) 39_20(-1.95,-0.24) 39_21(-0.55,-0.24)
  Keep-Out Layer region: -9.042,10.287 9.042,10.287 9.042,16.383 -9.042,16.383
  silkscreen extent -9.8,-9.22 9.09,16.43, body extent -9,-9.12 9,16.38, height 3.25
1812-FUSE [mm] "13.2V 2.6A 40A 800mW -40?~+85? 5.2A 10mO 2.5s 50mO 1812 Resettable Fuses ROHS"
  rect 1.78x3.15 smd mask+0.05: 1(-2.615,0) 2(2.615,0)
  silkscreen extent -1.63,-1.6 1.63,1.6, body extent -2.27,-1.62 2.27,1.62, height 0.85
B2B-XH-A(LF)(SN)_ [mm]
  rect 2x2 hole 1: 1(-1.25,0)
  round 2 hole 1: 2(1.25,0)
  silkscreen extent -3.78,-3.43 3.74,2.44, body extent -3.72,-3.37 3.68,2.38, height 7
Cap-0402 [mil]
  rect 18x25 smd mask+2.36: 1(-18.5,0) 2(18.5,0)
  silkscreen extent -31,-16 31,16, body extent -20,-10 20,10, height 19
Cap-0603 [mil]
  rect 30x35 smd mask+2.36: 1(-30,0) 2(30,0)
  silkscreen extent -49,-21 49,21, body extent -32,-16 31,16, height 34
Cap-0805 [mil] "SMD 0805"
  rect 40x60 smd mask+2.76: 1(-40,0) 2(40,0)
  silkscreen extent -64,-34 64,34, body extent -39,-25 39,25, height 30
Case-E [mm]
  rect 2.79x2.57 smd: 1(0,0) 2(6.44,0)
  silkscreen extent -1.63,-2.31 7.03,2.34, body extent -0.27,-2.21 6.92,2.21, height 2.88
ESSOP-10 [mm]
  rect 1.5x0.6 smd: 1(-3,2) 2(-3,1) 3(-3,0) 4(-3,-1) 5(-3,-2) 6(3,-2) 7(3,-1) 8(3,0) 9(3,1) 10(3,2)
  rect 2.1x3.3 smd: 11(0,0)
  silkscreen extent -4.11,-2.53 1.15,2.53, body extent -3,-2.51 3,2.49, height 1.8
HDR1X2_ [mm] "CONN HEADER VERT 2POS 2.54MM"
  rect 1.5x1.5 hole 0.9: 1(0,0)
  round 1.5 hole 0.9: 2(2.54,0)
  silkscreen extent -1.27,-1.27 3.81,1.27, body extent -1.27,-1.27 3.81,1.27, height 8.44
"IND-0603 (1608 Metric)" [mm] "0.063\" L x 0.032\" W (1.60mm x 0.80mm)"
  rect 0.6x0.8 smd: 1(-0.7,0) 2(0.7,0)
  silkscreen extent -0.2,-0.46 0.23,0.46, body extent -0.8,-0.4 0.8,0.4, height 0.78
IND-1210 [mm]
  rect 1.27x2.81 smd: 1(-1.471,0) 2(1.471,0)
  silkscreen extent -0.52,-1.4 0.52,1.4, body extent -1.6,-1.4 1.6,1.4, height 2.5
LED-0603 [mm]
  rect 0.5x1 smd: 1(-0.75,0) 2(0.75,0)
  silkscreen extent -1.12,-0.66 1.75,0.66, body extent -0.82,-0.37 0.82,0.36, height 0.68
QFN-28-EP(4x4) [mm]
  rect 0.665x0.22 smd: 1(-1.933,1.35) 2(-1.933,0.9) 3(-1.933,0.45) 4(-1.933,0) 5(-1.933,-0.45) 6(-1.933,-0.9) 7(-1.933,-1.35) 15(1.933,-1.35) 16(1.933,-0.9) 17(1.933,-0.45) 18(1.933,0) 19(1.933,0.45) 20(1.933,0.9) 21(1.933,1.35)
  rect 0.22x0.665 smd: 8(-1.35,-1.933) 9(-0.9,-1.933) 10(-0.45,-1.933) 11(0,-1.933) 12(0.45,-1.933) 13(0.9,-1.933) 14(1.35,-1.933) 22(1.35,1.933) 23(0.9,1.933) 24(0.45,1.933) 25(0,1.933) 26(-0.45,1.933) 27(-0.9,1.933) 28(-1.35,1.933)
  rect 2.4x2.4 smd: 29(0,0)
  silkscreen extent -2.51,-2 2,2, body extent -1.96,-1.96 1.96,1.96, height 0.7
Res-0603 [mil]
  rect 30x35 smd: 1(-30,0) 2(30,0)
  silkscreen extent -48,-21 48,21, body extent -31,-17 31,17, height 18
RES-0805 [mil] "SMD 0805"
  rect 40x50 smd: 1(-40,0) 2(40,0)
  silkscreen extent -64,-29 64,29, body extent -39,-25 39,24, height 24
SMA [mm]
  rect 2.5x1.7 smd: 1(-2,0) 2(2,0)
  silkscreen extent -4.44,-1.42 2.06,1.42, body extent -2.6,-1.3 2.6,1.3, height 2.4
SMD5050 [mm]
  rect 1.6x1 smd: 1(-2.4,1.6) 2(-2.4,0) 3(-2.4,-1.6) 4(2.4,-1.6) 5(2.4,0) 6(2.4,1.6)
  silkscreen extent -3.51,-2.57 2.49,2.57, body extent -2.66,-2.5 2.74,2.5, height 1.62
SOD323F [mm]
  rect 0.6x0.6 smd: 1(-1.05,0) 2(1.05,0)
  silkscreen extent -0.91,-0.79 2.11,0.79, body extent -1.25,-0.68 1.25,0.68, height 1
SOD-323 [mm]
  rect 0.8x0.9 smd mask+0.055: 1(-1.15,0) 2(1.15,0)
  silkscreen extent -2,-0.79 0.94,0.78, body extent -1.3,-0.67 1.3,0.67, height 1.1
"Solder Bridge 0402" [mil]
  rect 18x25 smd mask+2.17: 1(-18.5,0) 2(18.5,0)
  silkscreen extent -32,-17 32,16
SOT-23 [mm] "TRANS NPN 40V 0.6A SOT23"
  rect 0.82x0.92 smd: 1(-0.95,-1) 2(0.95,-1) 3(0,1)
  silkscreen extent -1.68,-1.3 1.55,0.81, body extent -1.5,-1.25 1.5,1.25, height 1.05
SOT-23-3L_ [mm]
  rect 0.82x0.92 smd: 1(-0.95,-1) 2(0.95,-1) 3(0,1)
  silkscreen extent -1.65,-1.17 1.56,0.86, body extent -1.5,-1.25 1.5,1.25, height 1.1
SOT-23-5 [mm]
  rect 1.1x0.6 smd: 1(-1.3,0.95) 2(-1.3,0) 3(-1.3,-0.95) 4(1.3,-0.95) 5(1.3,0.95)
  silkscreen extent -2.13,-1.5 0.88,1.5, body extent -1.4,-1.45 1.4,1.45, height 1.45
SOT-23-6 [mm]
  rect 1.22x0.62 smd: 1(-1.31,0.95) 2(-1.31,0) 3(-1.31,-0.95) 4(1.31,-0.95) 5(1.31,0) 6(1.31,0.95)
  silkscreen extent -2.18,-1.52 0.86,1.52, body extent -1.5,-1.5 1.5,1.5, height 1.47
SOT-723 [mm]
  rect 0.5x0.45 smd: 1(-0.4,-0.575) 2(0.4,-0.575) 3(0,0.575)
  silkscreen extent -0.94,-0.66 0.64,0.64, body extent -0.6,-0.6 0.6,0.6, height 0.5
SS-12D11L5 [mm]
  round 2.8 hole 1.6: 1(-4.8,-4.6) 2(0,-4.6) 3(4.8,-4.6) 4(-6.65,4.6) 5(6.65,4.6)
  silkscreen extent -6.65,-4.6 6.65,6.35, body extent -6.7,-5.21 6.8,13.24, height 7.1
ST-1112RA-P_ [mm]
  rect 1.2x1.2 smd: 1(-2.1,-1) 2(2.1,-1) 3(-3.5,1) 4(3.5,1)
  round 0 hole 0.8: MH(-3.8,0.75) MH(-1.15,0.4) MH(3.8,0.75)
  round 0 hole 0.8 unplated: MH(-1.15,0.4) MH(1.15,0.4)
  silkscreen extent -4.29,-1.98 4.29,2.21, body extent -3.85,-1.38 3.85,2.82, height 3.75
Test-point [mil]
  oct 60x60 smd: 1(0,0)
  silkscreen extent -37,-37 37,37
"TO-263-5 (D2PAK)" [mm]
  rect 1.02x4.32 smd: 1(-3.4,-4.573) 2(-1.7,-4.573) 3(0,-4.573) 4(1.7,-4.573) 5(3.4,-4.573)
  rect 11.18x9.91 smd: 6(0,4.573)
  silkscreen extent -5.16,-4.72 5.16,-0.61, body extent -5.11,-5.78 5.05,9.13, height 4.83
TQFN-16-EP(4x4)_ [mm]
  rect 0.65x0.4 smd: 1(-1.725,0.991) 2(-1.725,0.341) 3(-1.725,-0.309) 4(-1.725,-0.959) 9(1.725,-0.959) 10(1.725,-0.309) 11(1.725,0.341) 12(1.725,0.991)
  rect 0.4x0.65 smd: 5(-0.975,-1.692) 6(-0.325,-1.692) 7(0.325,-1.692) 8(0.975,-1.692) 13(0.975,1.725) 14(0.325,1.725) 15(-0.325,1.725) 16(-0.975,1.725)
  rect 2.2x2.2 smd: 17(0,0)
  silkscreen extent -2.36,-2.02 2.06,2.06, body extent -2,-2 2,2, height 0.9
TS-1109S-B-J_ [mm]
  rect 1.4x1.1 smd: 1(-3.25,1.5) 2(3.25,1.5) 3(3.25,-1.5) 4(-3.25,-1.5)
  silkscreen extent -2.46,-2.31 2.46,2.31, body extent -3.5,-2.25 3.5,2.25, height 7.12
TS-1109S-C-B [mm]
  rect 1.4x1.1 smd: 1(-3.25,-1.5) 2(3.25,-1.5) 3(3.25,1.5) 4(-3.25,1.5)
  silkscreen extent -2.41,-2.31 2.41,2.31, body extent -3.5,-2.25 3.5,2.25, height 4.3
TYPE-C-31-M-12_ [mm]
  rect 0.6x1.2 smd: A1/B12(0,0) A4/B9(0.8,0) B1/A12(6.4,0) B4/A9(5.6,0)
  rect 0.3x1.2 smd: A5(1.95,0) A6(2.95,0) A7(3.45,0) A8(4.45,0) B5(4.95,0) B6(3.95,0) B7(2.45,0) B8(1.45,0)
  round 0 hole 0.62 unplated: MH(0.31,-1.07) MH(6.09,-1.07)
  oval 0.9x2 hole 0.6 slot 1.7 at 90 deg: S1(7.525,-0.57) S4(-1.125,-0.57)
  oval 0.9x1.7 hole 0.6 slot 1.4 at 90 deg: S2(7.525,-4.75) S3(-1.125,-4.75)
  silkscreen extent -1.3,-5.94 7.7,-1.93, body extent -1.27,-7.32 7.67,0.58, height 3.31
"Voltlink Target" [mm]
  rect 0.5x1.6 smd: 1(-2.5,-1.262) 2(-1.5,-1.262) 3(-0.5,-1.262) 4(0.5,-1.262) 5(1.5,-1.262) 6(2.5,-1.262)
  rect 1.2x1.8 smd: MP1(-3.8,1.262) MP2(3.8,1.262)
  silkscreen extent -4.06,-1.68 4.06,2.17, body extent -4,-1.49 4,2.11, height 4.25
VSOF-5 [mm]
  rect 0.35x0.25 smd: 1(-0.675,0.5) 2(-0.675,0) 3(-0.675,-0.5) 4(0.675,-0.5) 5(0.675,0.5)
  silkscreen extent -1.12,-0.86 0.51,0.86, body extent -0.8,-0.82 0.8,0.82, height 0.6
YPRH1204-220M_ [mm]
  rect 2.8x5.4 smd: 1(-4.9,0) 2(4.9,0)
  silkscreen extent -6.06,-6.05 6.07,6.05, body extent -5.99,-6 6.01,6, height 5
YSPI0520-2R2M_ [mm]
  rect 2x2.5 smd: 1(-2.5,0) 2(2.5,0)
  silkscreen extent -2.7,-2.6 2.7,2.6, body extent -2.7,-2.6 2.7,2.6, height 1.8

## Part data
C1 C5 C37 C50 C52 C61 C66 C68: library part CC0805KKX5R8BB106, "CAP CER 10UF 25V X5R 0805", Case Code (Imperial)=0805, Case Code (Metric)=2012, Dielectric=X5R, LCSC Part Number=C89831, Manufacturer=Yageo, Max Operating Temperature=85°C, Min Operating Temperature=-55°C, Resistor Type=Ceramic, Supplier Part Number 1=311-1869-1-ND, Tolerance=10%, Voltage Rating=25V, Capacitance=10uF, Case/Package=0805, Category="Ceramic Capacitors", ComponentLink1Description=http://www.mouser.com/ds/2/447/UPY-GPHC_X5R_4V-to-50V_25-1131599.pdf?src-supplier=Mouser, ComponentLink1URL=http://www.mouser.com/ds/2/447/UPY-GPHC_X5R_4V-to-50V_25-1131599.pdf?src-supplier=Mouser, ComponentLink2Description=http://www.yageo.com/documents/recent/UPY-GPHC_X5R_4V-to-50V_25.pdf?src-supplier=Digi-Key, ComponentLink2URL=http://www.yageo.com/documents/recent/UPY-GPHC_X5R_4V-to-50V_25.pdf?src-supplier=Digi-Key, Depth=1.25mm, Halogen Free="Halogen Free", Lead Free="Lead Free", Length=0.079inch, Manufacturer Part Number=CC0805KKX5R8BB106, Mount="Surface Mount", Packaging="Tape and Reel", Pricing 1="1=0.31000, 10=0.21200, 50=0.14820, 100=0.12710, 500=0.09534, 1000=0.08050 (USD)", RoHS=Yes, RoHS Compliant=Yes, Series=CC, Stock 1=554290, Supplier 1=Digi-Key, Termination=SMD/SMT, Thickness=0.057inch, Voltage Rating (DC)=25V, Weight=0.000194oz, Width=0.049inch
  C37: Item Type=Capacitor
C2 C3 C4 C6 C8 C9 C12 C13 C15 C17 C18 C19 C20 C21 C22 C24 C29 C30 C32 C34 C38 C40 C41 C43 C46 C62 C77 C81: library part CC0402KRX5R8BB104, "CAP CER 0.1UF 25V X5R 0402", Case Code (Imperial)=0402, Case Code (Metric)=1005, Dielectric=X5R, LCSC Part Number=C106256, Manufacturer=Yageo, Max Operating Temperature=85°C, Min Operating Temperature=-55°C, Resistor Type=Ceramic, Supplier Part Number 1=311-1697-1-ND, Tolerance=10%, Voltage Rating=25V, Capacitance=100nF, Case/Package=0402, Category="Ceramic Capacitors", ComponentLink1Description=http://www.mouser.com/ds/2/447/UPY-GPHC_X5R_4V-to-50V_25-1131599.pdf?src-supplier=Mouser, ComponentLink1URL=http://www.mouser.com/ds/2/447/UPY-GPHC_X5R_4V-to-50V_25-1131599.pdf?src-supplier=Mouser, ComponentLink2Description=http://www.yageo.com/documents/recent/UPY-GPHC_X5R_4V-to-50V-16.pdf?src-supplier=Future+Electronics, ComponentLink2URL=http://www.yageo.com/documents/recent/UPY-GPHC_X5R_4V-to-50V-16.pdf?src-supplier=Future+Electronics, ComponentLink3Description=http://www.yageo.com/documents/recent/UPY-GPHC_X5R_4V-to-50V_25.pdf?src-supplier=Digi-Key, ComponentLink3URL=http://www.yageo.com/documents/recent/UPY-GPHC_X5R_4V-to-50V_25.pdf?src-supplier=Digi-Key, Depth=0.5mm, Halogen Free="Halogen Free", Item Type=Capacitor, Lead Free="Lead Free", Length=0.039inch, Manufacturer Part Number=CC0402KRX5R8BB104, Mount="Surface Mount", Packaging="Tape and Reel", Pricing 1="1=0.10000, 10=0.03800, 50=0.02100, 100=0.01710, 500=0.01224, 1000=0.00961, 2500=0.00874, 5000=0.00804 (USD)", RoHS=Yes, RoHS Compliant=Yes, Series=CC, Stock 1=4598218, Supplier 1=Digi-Key, Thickness=0.022inch, Voltage Rating (DC)=25V, Width=0.02inch
C7 C59: library part 25SVPF330M, "CAP ALUM POLY 330UF 20% 25V SMD", Case/Package=Radial, ESR (Equivalent Series Resistance)=14mR, LCSC Part Number=C178367, Leakage Current=1.65mA, Manufacturer=Panasonic, Max Operating Temperature=105°C, Min Operating Temperature=-55°C, Package Quantity=400, Ripple Current=5A, Supplier Part Number 1=68AC5716, Tolerance=20%, Voltage=25V, Capacitance=330uF, Category="Polymer Capacitors", ComponentLink1Description=https://datasheet.ciiva.com/48542/svpf-eng-ds-48542398.pdf?src-supplier=Distrelec, ComponentLink1URL=https://datasheet.ciiva.com/48542/svpf-eng-ds-48542398.pdf?src-supplier=Distrelec, ComponentLink2Description=https://datasheet.ciiva.com/22746/1734360-22746217.pdf?src-supplier=Element14, ComponentLink2URL=https://datasheet.ciiva.com/22746/1734360-22746217.pdf?src-supplier=Element14, ComponentLink3Description=https://datasheet.ciiva.com/24216/svpf-os-262415-24216060.pdf?src-supplier=Mouser, ComponentLink3URL=https://datasheet.ciiva.com/24216/svpf-os-262415-24216060.pdf?src-supplier=Mouser, ComponentLink4Description=https://datasheet.ciiva.com/46650/70324301-46650266.pdf?src-supplier=Allied+Electronics, ComponentLink4URL=https://datasheet.ciiva.com/46650/70324301-46650266.pdf?src-supplier=Allied+Electronics, Construction=Cylindrical, Diameter=10mm, Dissipation Factor=12%, Height=12.6mm, Height - Seated (Max)=0.5inch, Item Type=Capacitor, Lead Free="Lead Free", Length=12.6mm, Life (Hours)=5000Hour, Manufacturer Part Number=25SVPF330M, Mount="Surface Mount", Number of Pins=12, Packaging="Tape and Reel", Polarity=Polar, Pricing 1="1=2.46000, 10=2.01000, 25=1.86000, 50=1.72000, 100=1.57000, 250=1.54000 (USD)", Reach SVHC Compliant=Yes, Ripple Current (AC)=5A, RoHS=Yes, RoHS Compliant=Yes, Series="OS-CON™, SVPF", Stock 1=680, Supplier 1=Avnet, Termination=SMD/SMT, Voltage Rating=25V, Voltage Rating (DC)=25V
C10 C11: library part 25SVPF100M, "CAP ALUM POLY 100UF 20% 25V SMD", Case/Package=Radial, ESR (Equivalent Series Resistance)=24mR, LCSC Part Number=C136279, Leakage Current=500uA, Manufacturer=Panasonic, Max Operating Temperature=105°C, Min Operating Temperature=-55°C, Package Quantity=1000, Ripple Current=3.2A, Supplier Part Number 1=P123675CT-ND, Tolerance=20%, Voltage=25V, Capacitance=100uF, Category="Aluminum Electrolytic Capacitors", ComponentLink1Description=https://datasheet.ciiva.com/25746/1734360-25746518.pdf?src-supplier=Farnell, ComponentLink1URL=https://datasheet.ciiva.com/25746/1734360-25746518.pdf?src-supplier=Farnell, ComponentLink2Description=https://datasheet.ciiva.com/22746/1734360-22746213.pdf?src-supplier=Element14, ComponentLink2URL=https://datasheet.ciiva.com/22746/1734360-22746213.pdf?src-supplier=Element14, ComponentLink3Description=https://datasheet.ciiva.com/24064/svpf-os-262415-24064540.pdf?src-supplier=Mouser, ComponentLink3URL=https://datasheet.ciiva.com/24064/svpf-os-262415-24064540.pdf?src-supplier=Mouser, Diameter=8mm, Dissipation Factor=12%, Height=6.9mm, Height - Seated (Max)=0.276inch, Item Type=Capacitor, Lead Free="Lead Free", Length=6.9mm, Life (Hours)=5000Hour, Manufacturer Part Number=25SVPF100M, Mount="Surface Mount", Number of Pins=7, Packaging="Tape and Reel", Pricing 1="1=1.68000, 10=1.32800, 50=1.15080, 100=0.99590, 500=0.75246 (USD)", Reach SVHC Compliant=Yes, Ripple Current (AC)=3.2A, RoHS=Yes, RoHS Compliant=Yes, Series="OS-CON, SVPF", Stock 1=5809, Supplier 1=Digi-Key, Termination=SMD/SMT, Voltage Rating=25V, Voltage Rating (DC)=25V
C14 C35 C36 C47 C49 C51 C53 C55 C56 C57 C58 C60 C63 C64 C67 C69 C70 C72 C73 C75 C78 C79: library part CC0603KRX5R8BB105, "CAP CER 1UF 25V X5R 0603", Case Code (Imperial)=0603, Case Code (Metric)=1608, Dielectric=X5R, LCSC Part Number=C14664, Manufacturer=Yageo, Max Operating Temperature=85°C, Min Operating Temperature=-55°C, Package Quantity=1, Supplier Part Number 1=311-1445-1-ND, Tolerance=10%, Voltage Rating=25V, Capacitance=1uF, Case/Package=0603, Category="Ceramic Capacitors", ComponentLink1Description=https://datasheet.ciiva.com/176/mlccorderingcode-176785.pdf?src-supplier=Digi-Key, ComponentLink1URL=https://datasheet.ciiva.com/176/mlccorderingcode-176785.pdf?src-supplier=Digi-Key, ComponentLink2Description=https://datasheet.ciiva.com/176/mlccorderingcode-176786.pdf?src-supplier=Digi-Key, ComponentLink2URL=https://datasheet.ciiva.com/176/mlccorderingcode-176786.pdf?src-supplier=Digi-Key, ComponentLink3Description=https://datasheet.ciiva.com/176/mlccorderingcode-176787.pdf?src-supplier=Digi-Key, ComponentLink3URL=https://datasheet.ciiva.com/176/mlccorderingcode-176787.pdf?src-supplier=Digi-Key, ComponentLink4Description=https://datasheet.ciiva.com/17436/upy-gphc-x5r-4v-to-50v-12-17436952.pdf?src-supplier=Avnet+Europe, ComponentLink4URL=https://datasheet.ciiva.com/17436/upy-gphc-x5r-4v-to-50v-12-17436952.pdf?src-supplier=Avnet+Europe, ComponentLink5Description=https://datasheet.ciiva.com/7978/1525783-7978171.pdf?src-supplier=Element14, ComponentLink5URL=https://datasheet.ciiva.com/7978/1525783-7978171.pdf?src-supplier=Element14, ComponentLink6Description=https://datasheet.ciiva.com/11586/upy-gphc-x5r-4v-to-50v-12-11586318.pdf?src-supplier=Avnet, ComponentLink6URL=https://datasheet.ciiva.com/11586/upy-gphc-x5r-4v-to-50v-12-11586318.pdf?src-supplier=Avnet, Construction=Flat, Depth=0.8mm, Halogen Free="Halogen Free", Height=0.8mm, Lead Free="Lead Free", Length=1.6mm, Manufacturer Part Number=CC0603KRX5R8BB105, Mount="Surface Mount", Number of Pins=2, Packaging="Tape and Reel", Pricing 1="1=0.12000, 10=0.08400, 50=0.04760, 100=0.03940, 500=0.02764, 1000=0.02288 (USD)", Radiation Hardening=No, REACH SVHC="No SVHC", RoHS=Yes, RoHS Compliant=Yes, Series=CC, Stock 1=919939, Supplier 1=Digi-Key, Termination=SMD/SMT, Thickness=0.035inch, Voltage Rating (DC)=25V, Width=0.031inch
  C35 C36 C47 C49 C51 C53 C55 C56 C57 C58 C60 C63 C64 C67 C69 C70 C72 C73 C75 C78 C79: Item Type=Capacitor
C16: library part TAJE107M025RNJ, "CAP TANT 100UF 20% 25V 2917", Case Code (Imperial)=2917, Case Code (Metric)=7343, ESR (Equivalent Series Resistance)=300mR, LCSC Part Number=C7230, Leakage Current=25uA, Manufacturer="Kyocera AVX", Max Operating Temperature=125°C, Min Operating Temperature=-55°C, Package Quantity=1, Supplier Part Number 1=581-TAJE107M025RNJ, Tolerance=20%, Voltage Rating=25V, Capacitance=100uF, Case/Package=2917, Category="Tantalum Capacitors", ComponentLink1Description=https://datasheet.ciiva.com/26787/taje107m025rnj-26787048.pdf?src-supplier=IIIC, ComponentLink1URL=https://datasheet.ciiva.com/26787/taje107m025rnj-26787048.pdf?src-supplier=IIIC, ComponentLink2Description=https://datasheet.ciiva.com/265/taj-265541.pdf?src-supplier=Digi-Key, ComponentLink2URL=https://datasheet.ciiva.com/265/taj-265541.pdf?src-supplier=Digi-Key, ComponentLink3Description=https://datasheet.ciiva.com/265/taj-265542.pdf?src-supplier=Digi-Key, ComponentLink3URL=https://datasheet.ciiva.com/265/taj-265542.pdf?src-supplier=Digi-Key, ComponentLink4Description=https://datasheet.ciiva.com/265/taj-265540.pdf?src-supplier=Digi-Key, ComponentLink4URL=https://datasheet.ciiva.com/265/taj-265540.pdf?src-supplier=Digi-Key, ComponentLink5Description=https://datasheet.ciiva.com/28609/1719052-28609254.pdf?src-supplier=Element14, ComponentLink5URL=https://datasheet.ciiva.com/28609/1719052-28609254.pdf?src-supplier=Element14, ComponentLink6Description=https://datasheet.ciiva.com/11230/taj-11230456.pdf?src-supplier=Avnet, ComponentLink6URL=https://datasheet.ciiva.com/11230/taj-11230456.pdf?src-supplier=Avnet, ComponentLink7Description=https://datasheet.ciiva.com/17339/taj-17339677.pdf?src-supplier=Avnet+Europe, ComponentLink7URL=https://datasheet.ciiva.com/17339/taj-17339677.pdf?src-supplier=Avnet+Europe, ComponentLink8Description=https://datasheet.ciiva.com/22667/1719052-22667581.pdf?src-supplier=Element14, ComponentLink8URL=https://datasheet.ciiva.com/22667/1719052-22667581.pdf?src-supplier=Element14, Construction=Flat, Depth=4.3mm, Dissipation Factor=10%, Features="General Purpose", Height=4.3mm, Height - Seated (Max)=0.169inch, Lead Free="Lead Free", Length=7.3mm, Manufacturer Part Number=TAJE107M025RNJ, Mount="Surface Mount", Number of Pins=2, Packaging="Tape and Reel", Polarity=Polar, Pricing 1="1=2.81000, 10=2.81000, 50=2.81000, 100=2.19000, 1000=1.76000, 10000=1.76000 (USD)", Radiation Hardening=No, REACH SVHC="No SVHC", RoHS=Yes, RoHS Compliant=Yes, Series=TAJ, Stock 1=109, Supplier 1=Mouser, Termination=SMD/SMT, Voltage Rating (DC)=25V, Width=4.3mm
C23 C28 C31 C33 C39 C45: library part CC0603KRX5R7BB475, "CAP CER 4.7UF 16V X5R 0603", Case Code (Imperial)=0603, Case Code (Metric)=1608, Dielectric=X5R, LCSC Part Number=C277476, Manufacturer=Yageo, Max Operating Temperature=85°C, Min Operating Temperature=-55°C, Resistor Type=Ceramic, Supplier Part Number 1=311-1785-1-ND, Tolerance=10%, Voltage Rating=16V, Capacitance=4.7uF, Case/Package=0603, Category="Ceramic Capacitors", ComponentLink1Description=http://www.mouser.com/ds/2/447/UPY-GPHC_X5R_4V-to-50V_25-1131599.pdf?src-supplier=Mouser, ComponentLink1URL=http://www.mouser.com/ds/2/447/UPY-GPHC_X5R_4V-to-50V_25-1131599.pdf?src-supplier=Mouser, ComponentLink2Description=http://www.yageo.com/documents/recent/UPY-GPHC_X5R_4V-to-50V_25.pdf?src-supplier=Digi-Key, ComponentLink2URL=http://www.yageo.com/documents/recent/UPY-GPHC_X5R_4V-to-50V_25.pdf?src-supplier=Digi-Key, Depth=0.8mm, Halogen Free="Halogen Free", Height=0.8mm, Lead Free="Lead Free", Length=1.6mm, Manufacturer Part Number=CC0603KRX5R7BB475, Mount="Surface Mount", Packaging="Tape and Reel", Pricing 1="1=0.20000, 10=0.13800, 50=0.08280, 100=0.06990, 500=0.04784, 1000=0.04233 (USD)", RoHS=Yes, RoHS Compliant=Yes, Series=CC, Stock 1=547703, Supplier 1=Digi-Key, Termination=SMD/SMT, Thickness=0.037inch, Voltage Rating (DC)=16V, Weight=7.1E-05oz, Width=0.8mm
C25 C26 C27: library part GRM1555C1E330JA01D, "CAP CER 33PF 25V C0G/NP0 0402", Case Code (Imperial)=0402, Case Code (Metric)=1005, Dielectric=C0G, LCSC Part Number=C441758, Manufacturer=Murata, Max Operating Temperature=125°C, Min Operating Temperature=-55°C, Package Quantity=1, Supplier Part Number 1=490-6177-1-ND, Tolerance=5%, Voltage=25V, Capacitance=33pF, Case/Package=0402, ComponentLink1Description=https://www.murata.com/~/media/webrenewal/support/library/catalog/products/capacitor/mlcc/c02e.ashx?la=en-us&src-supplier=Digi-Key, ComponentLink1URL=https://www.murata.com/~/media/webrenewal/support/library/catalog/products/capacitor/mlcc/c02e.ashx?la=en-us&src-supplier=Digi-Key, ComponentLink2Description=http://www.mouser.com/ds/2/281/c02e-2905.pdf?src-supplier=Mouser, ComponentLink2URL=http://www.mouser.com/ds/2/281/c02e-2905.pdf?src-supplier=Mouser, ComponentLink3Description=http://psearch.murata.com/capacitor/product/GRM1555C1E330JA01%23.pdf?src-supplier=Avnet, ComponentLink3URL=http://psearch.murata.com/capacitor/product/GRM1555C1E330JA01%23.pdf?src-supplier=Avnet, Construction=Flat, Depth=0.5mm, Height=0.5mm, Lead Free="Lead Free", Length=1mm, Manufacturer Part Number=GRM1555C1E330JA01D, Mount="Surface Mount", Packaging="Tape and Reel", Pricing 1="1=0.1, 10=0.034, 50=0.0184, 100=0.0151, 500=0.01078, 1000=0.00847, 2500=0.0077, 5000=0.00708 (USD)", Radiation Hardening=No, RoHS Compliant=Yes, Series=GRM, Stock 1=250773, Supplier 1=Digi-Key, Termination=SMD/SMT, Thickness=0.022inch, Voltage Rating=25V, Voltage Rating (DC)=25V, Width=0.02inch
C42 C44: library part CC0603JRNPO9BN103, "CAP CER 10000PF 50V C0G/NPO 0603", Case/Package=0603, LCSC Part Number=C389113, Manufacturer=Yageo, Max Operating Temperature=125°C, Min Operating Temperature=-55°C, Tolerance=5%, Voltage Rating=50V, Capacitance=10nF, Category="Ceramic Capacitors", ComponentLink1Description=http://www.yageo.com/documents/recent/UPY-GP_NP0_16V-to-50V_16.pdf?src-supplier=Digi-Key, ComponentLink1URL=http://www.yageo.com/documents/recent/UPY-GP_NP0_16V-to-50V_16.pdf?src-supplier=Digi-Key, ComponentLink2Description=http://www.yageo.com/exep/pages/download/literatures/ProductSelectionGuide%202014_Final_2.pdf?src-supplier=Digi-Key, ComponentLink2URL=http://www.yageo.com/exep/pages/download/literatures/ProductSelectionGuide%202014_Final_2.pdf?src-supplier=Digi-Key, Item Type=Capacitor, Length=0.063inch, Manufacturer Part Number=CC0603JRNPO9BN103, Mount="Surface Mount", Packaging="Tape and Reel", Pricing 1="1=0.42340, 10=0.29770, 25=0.25590, 100=0.19550, 250=0.19360, 500=0.14320, 1000=0.12060, 3000=0.11930 (USD)", RoHS=Yes, RoHS Compliant=Yes, Stock 1=5425, Supplier 1="Arrow Electronics", Supplier Part Number 1=CC0603JRNPO9BN103, Thickness=0.035inch, Width=0.031inch
C48 C54 C65 C71: library part CC0603KRX7R9BB201, "CAP CER 200PF 50V X7R 0603", Case/Package=0603, Dielectric=X7R, LCSC Part Number=C107080, Manufacturer=Yageo, Max Operating Temperature=125°C, Min Operating Temperature=-55°C, Resistor Type=Ceramic, Tolerance=10%, Voltage Rating=50V, Category="Ceramic Capacitors", ComponentLink1Description=https://datasheet.ciiva.com/13210/upy-gphc-x7r-6-3v-to-50v-8-12304-13210555.pdf?src-supplier=Mouser, ComponentLink1URL=https://datasheet.ciiva.com/13210/upy-gphc-x7r-6-3v-to-50v-8-12304-13210555.pdf?src-supplier=Mouser, Construction=Flat, Depth=0.8mm, Halogen Free="Halogen Free", Item Type=Capacitor, Lead Free="Lead Free", Length=0.063inch, Manufacturer Part Number=CC0603KRX7R9BB201, Mounting Technology="Surface Mount", Packaging="Tape and Reel", Pricing 1="1=0.05400, 10=0.02000, 25=0.01980, 100=0.01530, 250=0.01520, 500=0.01090, 1000=0.00840, 3000=0.00810, 6000=0.00680 (USD)", Radiation Hardening=No, RoHS=Yes, Series=CC, Stock 1=6600, Supplier 1="Arrow Electronics", Supplier Part Number 1=CC0603KRX7R9BB201, Thickness=0.035inch, Voltage Rating (DC)=50V, Width=0.031inch
C74: library part CC0603JRNPO9BN101, "CAP CER 100PF 50V C0G/NPO 0603", Case Code (Imperial)=0603, Case Code (Metric)=1608, Dielectric=C0G, Insulation Resistance=100GR, LCSC Part Number=C14665, Manufacturer=Yageo, Max Operating Temperature=125°C, Min Operating Temperature=-55°C, Package Quantity=1, Resistor Type=Ceramic, Temperature Coefficient=30ppm/°C, Tolerance=5%, Voltage=50V, Capacitance=100pF, Case/Package=0603, Category="Ceramic Capacitors", ComponentLink1Description=https://datasheet.ciiva.com/11786/0900766b8079c870-11786060.pdf?src-supplier=RSComponents, ComponentLink1URL=https://datasheet.ciiva.com/11786/0900766b8079c870-11786060.pdf?src-supplier=RSComponents, ComponentLink2Description=https://datasheet.ciiva.com/7978/1443161-7978127.pdf?src-supplier=Element14, ComponentLink2URL=https://datasheet.ciiva.com/7978/1443161-7978127.pdf?src-supplier=Element14, ComponentLink3Description=https://datasheet.ciiva.com/28450/1443161-28450457.pdf?src-supplier=Element14, ComponentLink3URL=https://datasheet.ciiva.com/28450/1443161-28450457.pdf?src-supplier=Element14, ComponentLink4Description=https://datasheet.ciiva.com/46430/1835847-46430151.pdf?src-supplier=Element14, ComponentLink4URL=https://datasheet.ciiva.com/46430/1835847-46430151.pdf?src-supplier=Element14, ComponentLink5Description=https://datasheet.ciiva.com/144/mlccorderingcode-144629.pdf?src-supplier=Digi-Key, ComponentLink5URL=https://datasheet.ciiva.com/144/mlccorderingcode-144629.pdf?src-supplier=Digi-Key, ComponentLink6Description=https://datasheet.ciiva.com/144/mlccorderingcode-144628.pdf?src-supplier=Digi-Key, ComponentLink6URL=https://datasheet.ciiva.com/144/mlccorderingcode-144628.pdf?src-supplier=Digi-Key, ComponentLink7Description=https://datasheet.ciiva.com/144/mlccorderingcode-144630.pdf?src-supplier=Digi-Key, ComponentLink7URL=https://datasheet.ciiva.com/144/mlccorderingcode-144630.pdf?src-supplier=Digi-Key, ComponentLink8Description=https://datasheet.ciiva.com/11464/upy-gp-np0-16v-to-50v-8-11464725.pdf?src-supplier=Avnet, ComponentLink8URL=https://datasheet.ciiva.com/11464/upy-gp-np0-16v-to-50v-8-11464725.pdf?src-supplier=Avnet, ComponentLink9Description=https://datasheet.ciiva.com/26829/getdatasheetpartid-403525-26829372.pdf?src-supplier=Verical, ComponentLink9URL=https://datasheet.ciiva.com/26829/getdatasheetpartid-403525-26829372.pdf?src-supplier=Verical, Depth=0.8mm, Height=0.8mm, Lead Free="Lead Free", Length=1.6mm, Manufacturer Part Number=CC0603JRNPO9BN101, Mount="Surface Mount", Number of Pins=2, Packaging="Tape and Reel", Pricing 1="1=0.06030, 10=0.04400, 25=0.02170, 100=0.01580, 250=0.01330, 500=0.01300, 1000=0.01150, 3000=0.01010, 6000=0.00680 (USD)", Radiation Hardening=No, REACH SVHC=Unknown, RoHS=Yes, RoHS Compliant=Yes, Series=CC, Stock 1=10744, Supplier 1="Arrow Electronics", Supplier Part Number 1=CC0603JRNPO9BN101, Termination=SMD/SMT, Thickness=0.035inch, Voltage Rating=50V, Voltage Rating (DC)=50V, Width=0.8mm
C76: library part CC0603MRX5R6BB226, "CAP CER 22UF 10V X5R 0603", Case Code (Imperial)=0603, Case Code (Metric)=1608, Dielectric=X5R, LCSC Part Number=C109447, Manufacturer=Yageo, Max Operating Temperature=85°C, Min Operating Temperature=-55°C, Package Quantity=4000, Supplier Part Number 1=311-1819-1-ND, Tolerance=20%, Voltage Rating=10V, Capacitance=22uF, Case/Package=0603, Category="Ceramic Capacitors", ComponentLink1Description=http://www.mouser.com/ds/2/447/Yageo_UPY-GP_NP0_16V-to-50V_9-358835.pdf?src-supplier=Mouser, ComponentLink1URL=http://www.mouser.com/ds/2/447/Yageo_UPY-GP_NP0_16V-to-50V_9-358835.pdf?src-supplier=Mouser, ComponentLink2Description=http://www.yageo.com/documents/recent/UPY-GPHC_X5R_4V-to-50V_25.pdf?src-supplier=Digi-Key, ComponentLink2URL=http://www.yageo.com/documents/recent/UPY-GPHC_X5R_4V-to-50V_25.pdf?src-supplier=Digi-Key, Halogen Free="Halogen Free", Height=0.8mm, Lead Free="Lead Free", Length=0.063inch, Manufacturer Part Number=CC0603MRX5R6BB226, Mount="Surface Mount", Packaging="Tape and Reel", Pricing 1="1=0.68000, 10=0.48000, 50=0.36300, 100=0.31610, 500=0.23416, 1000=0.19903 (USD)", RoHS=Yes, RoHS Compliant=Yes, Stock 1=19628, Supplier 1=Digi-Key, Termination=SMD/SMT, Thickness=0.035inch, Voltage Rating (DC)=10V, Weight=7.1E-05oz, Width=0.8mm
C80: library part GRM1885C1H103JA01D, "CAP CER 10000PF 50V C0G/NP0 0603", Capacitance=10nF, Case Code (Imperial)=0603, Case Code (Metric)=1608, Dielectric=C0G, Manufacturer=Murata, Max Operating Temperature=125°C, Min Operating Temperature=-55°C, Package Quantity=4000, Supplier Part Number 1=1449032, Tolerance=5%, Voltage=50V, Case/Package=0603, Category="Ceramic Capacitors", ComponentLink1Description=https://datasheet.ciiva.com/41860/partnumbering-e-01-41860759.pdf?src-supplier=Digi-Key, ComponentLink1URL=https://datasheet.ciiva.com/41860/partnumbering-e-01-41860759.pdf?src-supplier=Digi-Key, ComponentLink2Description=https://datasheet.ciiva.com/29537/partnumbering-e-01-29537910.pdf?src-supplier=Digi-Key, ComponentLink2URL=https://datasheet.ciiva.com/29537/partnumbering-e-01-29537910.pdf?src-supplier=Digi-Key, Depth=0.8mm, Height=0.8mm, Lead Free="Lead Free", Lead Pitch=0.5mm, Length=1.6mm, Manufacturer Part Number=GRM1885C1H103JA01D, Material=Ceramic, Mount="Surface Mount", Packaging="Tape and Reel", Pricing 1="4000=0.03500, 8000=0.03200 (GBP)", REACH SVHC="No SVHC", RoHS=Yes, RoHS Compliant=Yes, Series=GRM, Stock 1=80000, Supplier 1=RSComponents, Termination=SMD/SMT, Thickness=0.035inch, Voltage Rating=50V, Voltage Rating (DC)=50V, Width=0.8mm
D1 D4: "DIODE ZENER 3.3V 200MW SOD323F", Forward Voltage=1V, LCSC Part Number=C2978865, Manufacturer="ON Semiconductor / Fairchild", Max Operating Temperature=150°C, Max Power Dissipation=200mW, Max Reverse Leakage Current=4.5uA, Min Operating Temperature=-65°C, Package Quantity=1, Supplier Part Number 1=MM3Z3V3BCT-ND, Test Current=5mA, Tolerance=2%, Working Voltage=3.3V, ComponentLink1Description=http://www.onsemi.com/pub/Collateral/MM3Z9V1B-D.pdf?src-supplier=Digi-Key, ComponentLink1URL=http://www.onsemi.com/pub/Collateral/MM3Z9V1B-D.pdf?src-supplier=Digi-Key, ComponentLink2Description=http://www.mouser.com/ds/2/149/MM3Z3V3B-187166.pdf?src-supplier=Mouser, ComponentLink2URL=http://www.mouser.com/ds/2/149/MM3Z3V3B-187166.pdf?src-supplier=Mouser, ComponentLink3Description=https://www.fairchildsemi.com/datasheets/MM/MM3Z9V1B.pdf?src-supplier=Avnet, ComponentLink3URL=https://www.fairchildsemi.com/datasheets/MM/MM3Z9V1B.pdf?src-supplier=Avnet, ComponentLink4Description=http://www.farnell.com/datasheets/1706525.pdf?src-supplier=Element14, ComponentLink4URL=http://www.farnell.com/datasheets/1706525.pdf?src-supplier=Element14, Element Configuration=Single, Height=1mm, Impedance=89R, Lead Free="Lead Free", Length=1.3mm, Manufacturer Part Number=MM3Z3V3B, Mount="Surface Mount", Number of Pins=2, Packaging="Tape and Reel", Peak Reverse Current=4.5uA, Power Dissipation=200mW, Pricing 1="1=0.22, 10=0.18, 100=0.0956, 500=0.06288, 1000=0.04276 (USD)", Radiation Hardening=No, REACH SVHC="No SVHC", Stock 1=473644, Supplier 1=Digi-Key, Voltage Tolerance=2%, Weight=0.0276g, Width=1.7mm, Zener Voltage=3.3V
D2: "TVS DIODE 12VWM 27VC SOD323", LCSC Part Number=C131084, Manufacturer=Nexperia, Supplier Part Number 1=771-PESD12S1UA115, Category="ESD and Circuit Protection ICs", ComponentLink1Description=http://www.farnell.com/datasheets/1508356.pdf?src-supplier=Farnell, ComponentLink1URL=http://www.farnell.com/datasheets/1508356.pdf?src-supplier=Farnell, Item Type="TVS Diode", Manufacturer Part Number=PESD12VS1UA,115, Pricing 1="1=0.47000, 10=0.34800, 50=0.34800, 100=0.19600, 1000=0.10300, 10000=0.07400 (USD)", RoHS=Yes, RoHS Compliant=Yes, Stock 1=44616, Supplier 1=Mouser
D3 D5 D8: "0.5mA@40V 40V Single 3A 0.55V@3A SMA(DO-214AC) Schottky Barrier Diodes (SBD) ROHS", LCSC Part Number=C8678, Manufacturer=MDD, Package=SMA(DO-214AC), ComponentLink1Description=LCSC, ComponentLink1URL=https://www.lcsc.com/product-detail/Schottky-Barrier-Diodes-SBD_MDD-Microdiode-Electronics-SS34_C8678.html, Item Type=Diode, Manufacturer Part Number=SS34